# Altium PCB Phaser.PcbDoc (part 4 of 16)
Units mm, origin at the board's own origin, x right, y up, seen from the top; angles counter-clockwise.
Board outline 161.99 x 100 mm, 6 copper layers (TopLayer, MidLayer1, MidLayer2, SignalLayer1, Internal Plane 1, BottomLayer), stack 1.528 mm thick; 1017 components, 665 nets, 3453 pads, 2223 vias.
Unrouted connection lines stored in the file: 1.
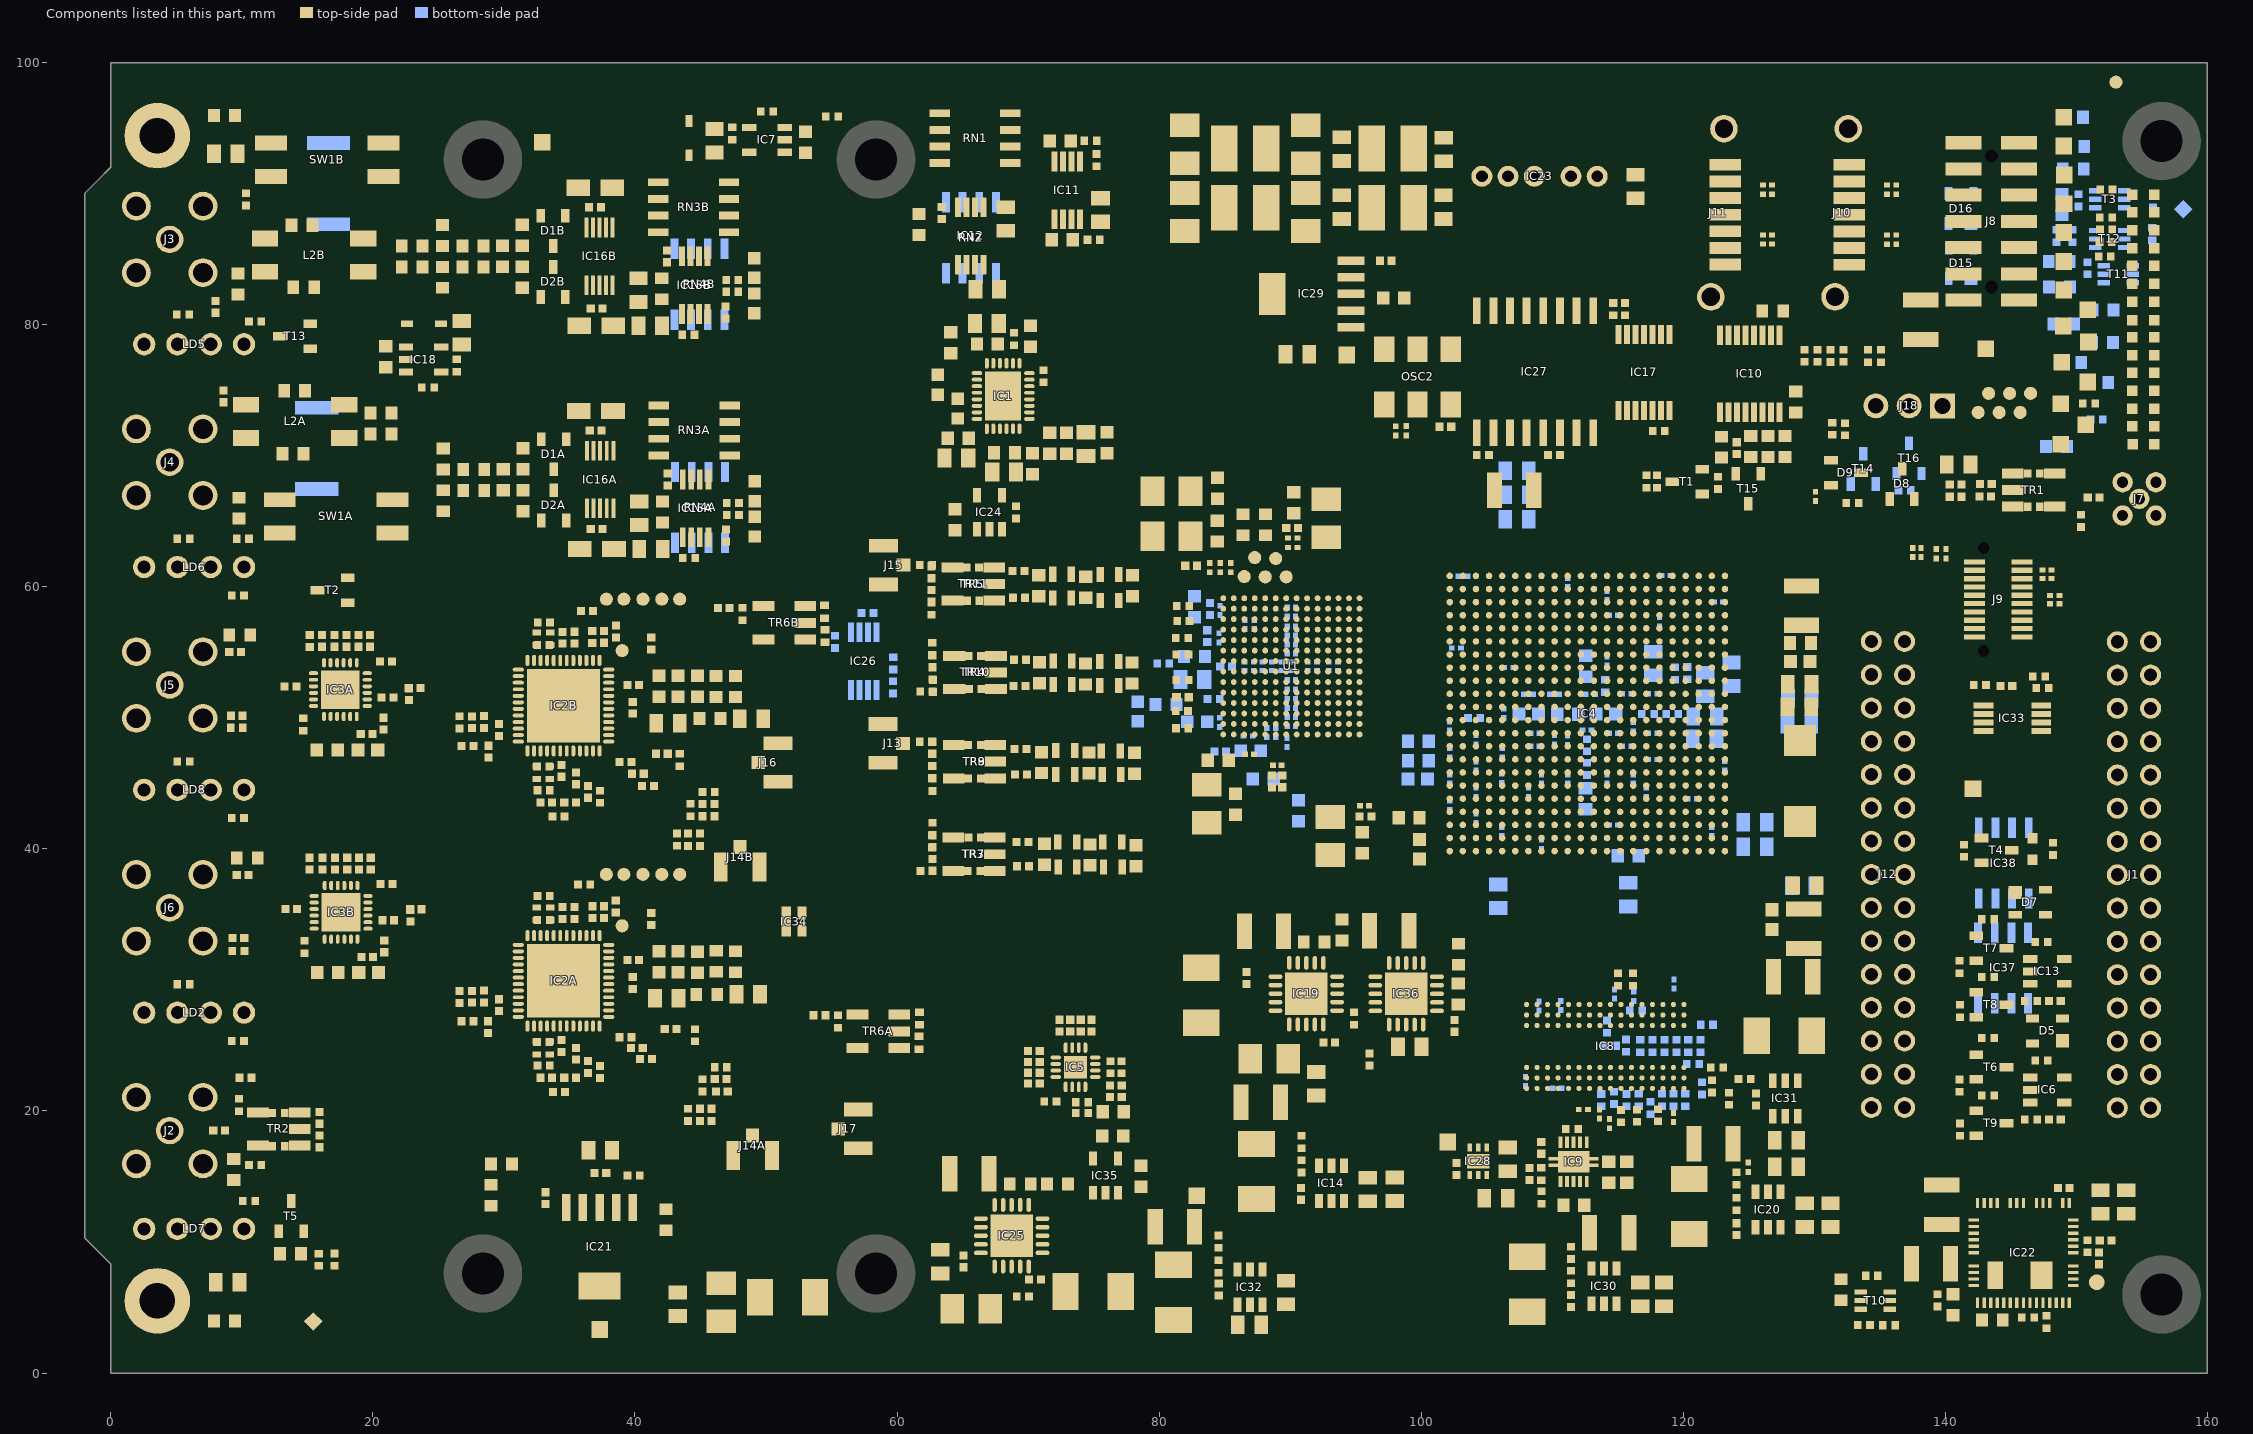
[diagram p7: the components of this part, seen from the top]

## Part data (continued)
C146 C224A C224B C226A C226B C227A C227B: library part CC0603_1NF_50V_1%_NP0, "Non-polarised capacitor", Case=0603, Manufacturer=GENERIC, Manufacturer1 ComponentHeight=0.9mm, Manufacturer1 Example=AVX, Manufacturer1 Part Number=06035A102FAT2A, Tolerance=±1%, Voltage=50V, Author="CERN DEM JLC", Component Type=Standard, CreateDate=15.06.2017, HelpURL=\\cern.ch\dfs\Applications\Altium\Datasheets\CC0603_C0G_AVX.pdf, LatestRevisionDate=15.06.2017, Manufacturer Part Number=CC0603_1NF_50V_1%_NP0, Mounted=Yes, Part Description="SMD Multilayer Chip Ceramic Capacitor", Part Number=CC0603_1NF_50V_1%_NP0, Pin Count=2, Sense=No, SMD=Yes, Socket=No, Status=None, TC=C0G/NP0
C156 C180 C184 C251 C255 C301 C305 C319 C350 C352 C364 C365: library part CTE3528-21_22UF_10V_10%_LESR0700, "Polarised capacitor", Case=B, Manufacturer=GENERIC, Manufacturer1 ComponentHeight=2.1mm, Manufacturer1 Example=AVX, Manufacturer1 Part Number=TPSB226K010R0700, Tolerance=±10%, Voltage=10V, Author="CERN DEM JLC", Component Type=Standard, CreateDate=05.05.2008, HelpURL=\\cern.ch\dfs\Applications\Altium\Datasheets\CTE-LESR_AVX_TPS.pdf, LatestRevisionDate=20.01.2009, Manufacturer Part Number=CTE3528-21_22UF_10V_10%_LESR0700, Mounted=Yes, Part Description="Low ESR 0R7 Solid Tantalum Chip Capacitor", Part Number=CTE3528-21_22UF_10V_10%_LESR0700, Pin Count=2, Sense=No, SMD=Yes, Socket=No, Status=Preferred
C161 C267 C369A C369B C370A C370B C371A C371B C372A C372B C373A C373B C374A C374B C375A C375B C376A C376B C377A C377B: library part CC0402_10NF_25V_10%_X7R, "Non-polarised capacitor", Case=0402, Manufacturer=GENERIC, Manufacturer1 ComponentHeight=0.55mm, Manufacturer1 Example=TDK, Manufacturer1 Part Number=C1005X7R1E103KT, Tolerance=±10%, Voltage=25V, Author="CERN DEM JLC", Component Type=Standard, CreateDate=25.10.2012, HelpURL=\\cern.ch\dfs\Applications\Altium\Datasheets\CC0402_X7R_TDK_C.pdf, LatestRevisionDate=25.10.2012, Manufacturer Part Number=CC0402_10NF_25V_10%_X7R, Mounted=Yes, Part Description="SMD Multilayer Chip Ceramic Capacitor", Part Number=CC0402_10NF_25V_10%_X7R, Pin Count=2, Sense=No, SMD=Yes, Socket=No, Status=Preferred, TC=X7R
C211: library part CC0603_1NF_100V_10%_X7R, "Non-polarised capacitor", Case=0603, Manufacturer=GENERIC, Manufacturer1 ComponentHeight=0.87mm, Manufacturer1 Example=KEMET, Manufacturer1 Part Number=C0603C102K1RACTU, Tolerance=±10%, Voltage=100V, Author="CERN DEM JLC", Component Type=Standard, CreateDate=12.12.2013, HelpURL=\\cern.ch\dfs\Applications\Altium\Datasheets\CC0603_X7R_KEMET.pdf, LatestRevisionDate=12.12.2013, Manufacturer Part Number=CC0603_1NF_100V_10%_X7R, Mounted=Yes, Part Description="SMD Multilayer Chip Ceramic Capacitor", Part Number=CC0603_1NF_100V_10%_X7R, Pin Count=2, Sense=No, SMD=Yes, Socket=No, Status=Preferred, TC=X7R
C218 C235: library part CC1210_47UF_10V_10%_X7R, "Non-polarised capacitor", Case=1210, Manufacturer=GENERIC, Manufacturer1 ComponentHeight=2.7mm, Manufacturer1 Example=MURATA, Manufacturer1 Part Number=GRM32ER71A476KE15, Tolerance=±10%, Voltage=10V, Author="CERN DEM BC", Component Type=Standard, CreateDate=18.11.2015, HelpURL=\\cern.ch\dfs\Applications\Altium\Datasheets\CC1210_X7R_MURATA.pdf, LatestRevisionDate=18.11.2015, Manufacturer Part Number=CC1210_47UF_10V_10%_X7R, Mounted=Yes, Part Description="SMD Multilayer Chip Ceramic Capacitor", Part Number=CC1210_47UF_10V_10%_X7R, Pin Count=2, Sense=No, SMD=Yes, Socket=No, Status=None, TC=X7R
C221A C221B C225A C225B: library part CC0603_8.2PF_50V_0.5PF_NP0, "Non-polarised capacitor", Case=0603, Manufacturer=GENERIC, Manufacturer1 ComponentHeight=0.87mm, Manufacturer1 Example=PHYCOMP, Manufacturer1 Part Number=223886715828, Tolerance=±0.5pF, Voltage=50V, Author="CERN DEM JLC", Component Type=Standard, CreateDate=03.12.2007, HelpURL=\\cern.ch\dfs\Applications\Altium\Datasheets\CC0603_NP0_PHYCOMP.pdf, LatestRevisionDate=03.12.2007, Manufacturer Part Number=CC0603_8.2PF_50V_0.5PF_NP0, Mounted=Yes, Part Description="SMD Multilayer Chip Ceramic Capacitor", Part Number=CC0603_8.2PF_50V_0.5PF_NP0, Pin Count=2, Sense=No, SMD=Yes, Socket=No, Status=Preferred, TC=C0G/NP0
C222A C222B: library part CC0603_39PF_50V_5%_NP0, "Non-polarised capacitor", Case=0603, Manufacturer=GENERIC, Manufacturer1 ComponentHeight=0.87mm, Manufacturer1 Example=PHYCOMP, Manufacturer1 Part Number=223886715399, Tolerance=±5%, Voltage=50V, Author="CERN DEM JLC", Component Type=Standard, CreateDate=03.12.2007, HelpURL=\\cern.ch\dfs\Applications\Altium\Datasheets\CC0603_NP0_PHYCOMP.pdf, LatestRevisionDate=03.12.2007, Manufacturer Part Number=CC0603_39PF_50V_5%_NP0, Mounted=Yes, Part Description="SMD Multilayer Chip Ceramic Capacitor", Part Number=CC0603_39PF_50V_5%_NP0, Pin Count=2, Sense=No, SMD=Yes, Socket=No, Status=Preferred, TC=C0G/NP0
C228A C228B C231A C231B: library part CTE3216-18_10UF_16V_20%_AVX_TCJ, "Polarised capacitor", Case=A, Manufacturer=AVX, Manufacturer Part Number=TCJA106M016R0200, Tolerance=±20%, Voltage=16V, Author="CERN DEM JLC", Component Type=Standard, ComponentHeight=1.8mm, CreateDate=29.03.2012, HelpURL=\\cern.ch\dfs\Applications\Altium\Datasheets\CTE_AVX_TCJ.pdf, LatestRevisionDate=29.03.2012, Mounted=Yes, Part Description="ESR 0R200 Tantalum Solid Electrolytic Chip Capacitor with Conductive Polymer Electrode", Part Number=CTE3216-18_10UF_16V_20%_AVX_TCJ, Pin Count=2, Sense=No, SMD=Yes, Socket=No, Status=Preferred
C243 C244: library part CC0805_NO-VALUE, "Non-polarised capacitor", Case=0805, Manufacturer1 ComponentHeight=1.35mm, Author="CERN DEM JLC", Component Type=Standard, CreateDate=10.12.2008, HelpURL=Undefined, LatestRevisionDate=11.09.2013, Manufacturer=Undefined, Manufacturer Part Number=CC0805_NO-VALUE, Mounted=No, Part Description="Reserved Footprint For 0805(2012) Chip Ceramic Capacitor", Part Number=CC0805_NO-VALUE, Pin Count=2, Sense=No, SMD=Yes, Socket=No, Status=None
C246A C246B C283A C283B: library part CC0603_1.5NF_50V_5%_NP0, "Non-polarised capacitor", Case=0603, Manufacturer=GENERIC, Manufacturer1 ComponentHeight=0.9mm, Manufacturer1 Example=MURATA, Manufacturer1 Part Number=GRM1885C1H152JA01D, Tolerance=±5%, Voltage=50V, Author="CERN DEM JLC", Component Type=Standard, CreateDate=08.02.2011, HelpURL=\\cern.ch\dfs\Applications\Altium\Datasheets\CC0603_NP0_MURATA.pdf, LatestRevisionDate=08.02.2011, Manufacturer Part Number=CC0603_1.5NF_50V_5%_NP0, Mounted=Yes, Part Description="SMD Multilayer Chip Ceramic Capacitor", Part Number=CC0603_1.5NF_50V_5%_NP0, Pin Count=2, Sense=No, SMD=Yes, Socket=No, Status=None, TC=C0G/NP0
C277A C277B: library part CC0603_10UF_16V_20%_X5R, "Non-polarised capacitor", Case=0603, Manufacturer=GENERIC, Manufacturer1 ComponentHeight=0.8mm, Manufacturer1 Example=MURATA, Manufacturer1 Part Number=GRM188R61C106MA73D, Tolerance=±20%, Voltage=16V, Author="CERN DEM MR", Component Type=Standard, CreateDate=2016-03-02, HelpURL=\\cern.ch\dfs\Applications\Altium\Datasheets\CC0603_X5R_MURATA_GRM.pdf, LatestRevisionDate=2016-03-02, Manufacturer Part Number=CC0603_10UF_16V_20%_X5R, Mounted=Yes, Part Description="SMD Multilayer Chip Ceramic Capacitor", Part Number=CC0603_10UF_16V_20%_X5R, Pin Count=2, Sense=No, SMD=Yes, Socket=No, Status=None, TC=X5R
C280A C280B C281A C281B: library part CC0402_0.5PF_25V_0.05PF_AVX_04023J0R5ABSTR, "Non-polarised capacitor", Case=0402, Manufacturer=AVX, Manufacturer Part Number=04023J0R5ABSTR, Tolerance=±0.05pF, Voltage=25V, Author="CERN DEM JLC", Component Type=Standard, ComponentHeight=0.5mm, CreateDate=2017-02-22, HelpURL=\\cern.ch\dfs\Applications\Altium\Datasheets\CC0402_AVX_ACCU-P.pdf, LatestRevisionDate=2017-02-22, Mounted=Yes, Part Description="Thin-Film Chip Capacitors for RF Signal and Power Applications, Accu-P Series", Part Number=CC0402_0.5PF_25V_0.05PF_AVX_04023J0R5ABSTR, Pin Count=2, Sense=No, SMD=Yes, Socket=No, Status=None
C282A C282B: library part CC0603_120PF_50V_5%_NP0, "Non-polarised capacitor", Case=0603, Manufacturer=GENERIC, Manufacturer1 ComponentHeight=0.87mm, Manufacturer1 Example=PHYCOMP, Manufacturer1 Part Number=223886715121, Tolerance=±5%, Voltage=50V, Author="CERN DEM JLC", Component Type=Standard, CreateDate=03.12.2007, HelpURL=\\cern.ch\dfs\Applications\Altium\Datasheets\CC0603_NP0_PHYCOMP.pdf, LatestRevisionDate=03.12.2007, Manufacturer Part Number=CC0603_120PF_50V_5%_NP0, Mounted=Yes, Part Description="SMD Multilayer Chip Ceramic Capacitor", Part Number=CC0603_120PF_50V_5%_NP0, Pin Count=2, Sense=No, SMD=Yes, Socket=No, Status=Preferred, TC=C0G/NP0
C284A C284B C285A C285B: library part CC0805_33pF_50V_5%_NP0, "Non-polarised capacitor", Case=0805, Manufacturer=GENERIC, Manufacturer1 ComponentHeight=1.35mm, Manufacturer1 Example=PHYCOMP, Manufacturer1 Part Number=223886115339, Manufacturer Part Number=CC0805_33PF_50V_5%_NP0, Tolerance=±5%, Voltage=50V, Author="CERN DEM JLC", Component Type=Standard, CreateDate=03.12.2007, HelpURL=\\cern.ch\dfs\Applications\Altium\Datasheets\CC0805_NP0_PHYCOMP.pdf, LatestRevisionDate=03.12.2007, Mounted=Yes, Part Description="SMD Multilayer Chip Ceramic Capacitor", Part Number=CC0805_33PF_50V_5%_NP0, Pin Count=2, Sense=No, SMD=Yes, Socket=No, Status=Preferred, TC=C0G/NP0
C322 C1009: library part CC0402_2.2UF_6.3V_10%_X5R, "Non-polarised capacitor", Case=0402, Manufacturer=GENERIC, Manufacturer1 ComponentHeight=0.55mm, Manufacturer1 Example=TDK, Manufacturer1 Part Number=C1005X5R0J225K050BC, Tolerance=±10%, Voltage=6.3V, Author="CERN DEM JMW", Component Type=Standard, CreateDate=22.09.2015, HelpURL=\\cern.ch\dfs\Applications\Altium\Datasheets\CC0402_X5R_TDK_C.pdf, LatestRevisionDate=22.09.2015, Manufacturer Part Number=CC0402_2.2UF_6.3V_10%_X5R, Mounted=Yes, Part Description="SMD Multilayer Chip Ceramic Capacitor", Part Number=CC0402_2.2UF_6.3V_10%_X5R, Pin Count=2, Sense=No, SMD=Yes, Socket=No, Status=Preferred, TC=X5R
C331: library part CC0402_15PF_50V_5%_C0G, "Non-polarised capacitor", Case=0402, Manufacturer=GENERIC, Manufacturer1 ComponentHeight=0.55mm, Manufacturer1 Example=KEMET, Manufacturer1 Part Number=C0402C150J5GACTU, Tolerance=±5%, Voltage=50V, Author="CERN DEM JLC", Component Type=Standard, CreateDate=03.12.2007, HelpURL="\\cern.ch\dfs\Applications\Altium\Datasheets\CC0805_C0G_KEMET_(Commercial Grade).pdf", LatestRevisionDate=22.04.2015, Manufacturer Part Number=CC0402_15PF_50V_5%_C0G, Mounted=Yes, Part Description="SMD Multilayer Chip Ceramic Capacitor", Part Number=CC0402_15PF_50V_5%_C0G, Pin Count=2, Sense=No, SMD=Yes, Socket=No, Status=Preferred, TC=C0G/NP0
D1A D1B D2A D2B D8 D9: "Serial Diode", Case=SOT23-3, Manufacturer="NXP SEMICONDUCTORS", Power=250mW, Voltage=75V, Author="CERN DEM JMW", Bonding=No, Component Type=Standard, ComponentHeight=1.1mm, CreateDate=2008-11-21, Device=BAV199, HelpURL=\\cern.ch\dfs\Applications\Altium\Datasheets\BAV199.pdf, LatestRevisionDate=2008-11-21, Manufacturer Part Number=BAV199, Mounted=Yes, PackageDescription="SOT23 3-Leads, Pitch 0.95mm - Body 1.4x3mm, IPC Medium Density", Part Description="Low-Leakage Double Diode", Part Number=BAV199, Pin Count=3, PressFit=No, Sense=No, SMD=Yes, Socket=No
D3 D6: "Schottky Diode", Case=SOD323, Manufacturer="NXP SEMICONDUCTORS", Power=200mA, Voltage=30V, Author="CERN DEM JLC", Bonding=No, Component Type=Standard, ComponentHeight=1.1mm, CreateDate=2012-12-06, Device=1PS76SB10, HelpURL=\\cern.ch\dfs\Applications\Altium\Datasheets\1PS76SB10.pdf, LatestRevisionDate=2012-12-06, Manufacturer Part Number=1PS76SB10, Mounted=Yes, PackageDescription="Small Outline Diode Flat Lead (SOD-323), 1.70mm W X 1.25mm L X 1.10mm H body,  IPC Medium Density", Part Description="Schottky Barrier Single Diode", Part Number=1PS76SB10, Pin Count=2, PressFit=No, Sense=No, SMD=Yes, Socket=No
D5 D7 D15 D16: "Ultra Low Capacitance Double Rail-to-Rail ESD Protection Diode", Case=SOT143B, Manufacturer="NXP SEMICONDUCTORS", Voltage=5.5V, Author="CERN DEM JLC", Bonding=No, Component Type=Standard, ComponentHeight=1.1mm, CreateDate=22.03.2011, Device=PRTR5V0U2X, HelpURL=\\cern.ch\dfs\Applications\Altium\Datasheets\PRTR5V0U2X.pdf, LatestRevisionDate=22.03.2011, Manufacturer Part Number=PRTR5V0U2X, Mounted=Yes, PackageDescription="SOT143B, SOT, 1.90mm Pitch; 4 Pin, 1.30mm W X 2.90mm L X 1.10mm H body, IPC Medium Density", Part Description="Ultra Low Capacitance (1pF) Double Rail-to-Rail ESD Protection Diode (8kV)", Part Number=PRTR5V0U2X, Pin Count=4, PressFit=No, Sense=No, SMD=Yes, Socket=No
FTG1: library part FIDUCIAL_TARGET_C100-200, "Fiducial Target", Author="CERN DEM JLC", Component Type="Standard (No BOM)", ComponentHeight=0mm, CreateDate=09.02.2010, Family=Fiducial, HelpURL=Undefined, LatestRevisionDate=04.04.2012, Mounted=No, PackageDescription="Round Fiducial Target, Top Layer, 1.0mm, Top Solder 2.0mm, Keepout =2.0mm", Part Description="Round Fiducial Target, Top Layer, 1.0mm, Top Solder 2.0mm, Keepout =2.0mm", Part Number=FIDUCIAL_TARGET_C100-200, Pin Count=1, Sense=No, SMD=Yes, Socket=No, Status=None
FTG2 FTG3 FTG4: library part FIDUCIAL_TARGET_S100-200, "Fiducial Target", Author="CERN DEM JLC", Component Type="Standard (No BOM)", ComponentHeight=0mm, CreateDate=09.02.2010, Family=Fiducial, HelpURL=Undefined, LatestRevisionDate=04.04.2012, Mounted=No, PackageDescription="Square Fiducial Target, Top Layer, 1.0mm, Top Solder 2.0mm, Keepout =2.0mm", Part Description="Square Fiducial Target, Top Layer, 1.0mm, Top Solder 2.0mm, Keepout =2.0mm", Part Number=FIDUCIAL_TARGET_S100-200, Pin Count=1, Sense=No, SMD=Yes, Socket=No, Status=None
HS1: "Heat Sink Without Pad", Manufacturer="Radian Thermal Products, Inc.", Manufacturer Part Number=FI23+BU+T725, ComponentHeight="16 mm", HelpURL=https://www.radianheatsinks.com/product/fi23/, Part Description="23 x 23 x 16 mm, clip on heatsink with fan for IC design BGA and others"
HS2: library part HEAT_SINK_BGA_12x12x18, "Rth: 27.5K/W - L 12mm x W 12mm x H 18mm Black Anodized Heatsinks for BGA", Manufacturer=CUI, Manufacturer Part Number=HSB03-121218, Author=GK, Component Type=Standard, ComponentHeight=10mm, CreateDate=28.05.2015, HelpURL="\\cern.ch\dfs\Applications\Altium\Datasheets\HSINK_FISCHER_ICK SMD A 13 SA.pdf", LatestRevisionDate=28.05.2015, Mounted=Yes, PackageDescription="Rth: 24K/W - L 12mm x W 12mm x H 18mm Black Anodized Heatsinks for BGA", Part Description="Rth: 27.5K/W - L 12mm x W 12mm x H 18mm Black Anodized Heatsinks for BGA", Part Number=HSB03-121218, Pin Count=0, PressFit=No, Sense=No, SMD=No, Socket=No, Status=None
HS3A HS3B: library part HEAT_SINK_IC_7x7x15, "Alphacool GPU RAM Aluminium Heatsinks 7x7mm - black", Manufacturer=Alphacool, Manufacturer Part Number=17156, Part Number=4250197171564, Author=GK, Component Type=Standard, ComponentHeight=18, CreateDate=28.05.2015, HelpURL="\\cern.ch\dfs\Applications\Altium\Datasheets\HSINK_FISCHER_ICK SMD A 13 SA.pdf", LatestRevisionDate=28.05.2015, Mounted=Yes, PackageDescription="Alphacool GPU RAM Aluminium Heatsinks 7x7mm - black", Part Description="Alphacool GPU RAM Aluminium Heatsinks 7x7mm", Pin Count=0, PressFit=No, Sense=No, SMD=No, Socket=No, Status=None
IC1: "Dual, 16-Bit, 5Msps Differential Input ADC with Wide Input Common Mode Range", Case=QFN28, Manufacturer="ANALOG DEVICES", Author="CERN DEM JMW", Bonding=No, Component Type=Standard, ComponentHeight=0.8mm, CreateDate=2019-11-29, Device=LTC2323CUFD-16#PBF, HelpURL=\\cern.ch\dfs\Applications\Altium\Datasheets\LTC2323CUFD-16#PBF.pdf, LatestRevisionDate=2019-11-29, Manufacturer Part Number=LTC2323CUFD-16#PBF, Mounted=Yes, PackageDescription="QFN, 0.50mm Pitch, Rectangular, 6 pin X 8 pin, 4mm X 5mm X 0.80mm H Body  (w/thermal tab 2.75 X 3.75mm), IPC Medium Density", Part Description="Dual, 16-Bit, 5Msps Differential Input ADC with Wide Input Common Mode Range", Part Number=LTC2323CUFD-16#PBF, Pin Count=29, PressFit=No, Sense=No, SMD=Yes, Socket=No
IC2A IC2B: "Integrated IQ Modulator PLL/VCO", Case=QFN48, Manufacturer="TEXAS INSTRUMENTS", Author="CERN DEM JMW", Bonding=No, Component Type=Standard, ComponentHeight=1mm, CreateDate=2019-11-29, Device=TRF372017IRGZ, HelpURL=\\cern.ch\dfs\Applications\Altium\Datasheets\TRF372017IRGZ.pdf, LatestRevisionDate=2019-11-29, Manufacturer Part Number=TRF372017IRGZ, Mounted=Yes, PackageDescription="QFN, 0.50mm Pitch, Square; 48 Pin, 7.00mm L X 7.00mm W X 1.00mm H body (W/Thermal Tab 5.6mm X 5.6mm), IPC Medium Density", Part Description="Integrated IQ Modulator PLL/VCO", Part Number=TRF372017IRGZ, Pin Count=49, PressFit=No, Sense=No, SMD=Yes, Socket=No
IC3A IC3B: "0.5dB LSB GaAs MMIC 6-bit Digital Serial Control Attenuator, DC - 4GHz", Case=QFN24, Manufacturer="HITTITE MICROWAVE CORP", Author="CERN DEM JMW", Bonding=No, Component Type=Standard, ComponentHeight=1mm, CreateDate=2016-08-17, Device=HMC542BLP4E, HelpURL=\\cern.ch\dfs\Applications\Altium\Datasheets\HMC542BLP4E.pdf, LatestRevisionDate=2016-08-17, Manufacturer Part Number=HMC542BLP4E, Mounted=Yes, PackageDescription="QFN, 0.50mm Pitch, Square; 24 Pin, 4.00mm L X 4.00mm W X 1.00mm H Body (w/thermal Tab 2.95 X 2.95mm), IPC Medium Density", Part Description="0.5dB LSB GaAs MMIC 6-bit Digital Serial Control Attenuator, DC to 4GHz", Part Number=HMC542BLP4E, Pin Count=25, PressFit=No, Sense=No, SMD=Yes, Socket=No
IC4: library part CMP-0364-00028-3, "Artix-7 FPGA, 285 User I/Os, 4 GTP, 484-Ball BGA, Speed Grade 3, Extended Grade, Pb-Free", Generic Part Number=XC7A100T, Manufacturer=Xilinx, Block RAM Blocks (18Kb)=270, Block RAM Blocks (36Kb)=135, Block RAM Blocks (Max Kb)=4860, CLBs (Max Distributed RAM Kb)=1188, CLBs (Slices)=15850, Clock Mgmt Tiles (CMTs)=6, Code_JEDEC=MS-034-AAJ-1, ComponentLink1Description=Datasheet, ComponentLink1URL=http://www.xilinx.com/support/documentation/data_sheets/ds180_7Series_Overview.pdf, ComponentLink2Description="Package Specification", ComponentLink2URL=http://www.xilinx.com/support/documentation/user_guides/ug475_7Series_Pkg_Pinout.pdf, ComponentLink3Description="DC and Switching Characteristics", ComponentLink3URL=http://www.xilinx.com/support/documentation/data_sheets/ds181_Artix_7_Data_Sheet.pdf, ComponentLink4Description="Package File", ComponentLink4URL=http://www.xilinx.com/support/packagefiles/a7packages/xc7a100tfgg484pkg.txt, ComponentLink5Description="Packaging and Pinout", ComponentLink5URL=http://www.xilinx.com/support/documentation/user_guides/ug475_7Series_Pkg_Pinout.pdf, DatasheetVersion=v1.12, DSP48E1 Slices=240, Logic Cells=101440, Max User I/O=300, Mounting Technology="Surface Mount", NexusDeviceID=XC7A100T-3FGG484E, PackageDescription="Wire-Bond Fine-Pitch BGA, Body 23 x 23 mm, 1.0 mm Pitch", PackageReference=FGG484, PackageVersion="Rev 1.8", PartNumber=XC7A100T-3FGG484E, RoHS=Pb-Free, Speed Grade=-3
IC5: "Low-Jitter LVDS Fanout Clock Buffers, 10-Output,  Any-Input, Any-Frequency up to 1250MHz", Case=QFN16, Manufacturer="SILICON LABS", Author="CERN DEM MR", Bonding=No, Component Type=Standard, ComponentHeight=0.9mm, CreateDate=04.09.2017, Device=Si53340-B-GM, HelpURL=\\cern.ch\dfs\Applications\Altium\Datasheets\Si53340-B-GM.pdf, LatestRevisionDate=04.09.2017, Manufacturer Part Number=Si53340-B-GM, Mounted=Yes, PackageDescription="QFN, 0.50mm Pitch, Square; 16 Pin, 3.00mm L X 3.00mm W X 0.90mm H Body (w/thermal tab 1.75mm x 1.75mm), IPC Medium Density", Part Description="Low-Jitter LVDS Fanout Clock Buffers, 10-Output,  Any-Input, Any-Frequency up to 1250MHz", Part Number=Si53340-B-GM, Pin Count=17, PressFit=No, Sense=No, SMD=Yes, Socket=No
IC6 IC13: "1.7V-5.5V, 2K I2C Serial EEPROM With EUI-48 Node Identity", Case=SOT23-5, Manufacturer="MICROCHIP TECHNOLOGY", Author="CERN DEM MR", Bonding=No, Component Type=Standard, ComponentHeight=1.45mm, CreateDate=31.03.2016, Device=24AA02E48T-I/OT, HelpURL=\\cern.ch\dfs\Applications\Altium\Datasheets\24AA02E48T-I-OT.pdf, LatestRevisionDate=31.03.2016, Manufacturer Part Number=24AA02E48T-I/OT, Mounted=Yes, PackageDescription="SOT, 0.95mm pitch; 5 pin, 1.60mm W X 2.90mm L X 1.45mm H body, IPC Medium Density", Part Description="1.7V-5.5V, 2K I2C Serial EEPROM With EUI-48 Node Identity", Part Number=24AA02E48T-I/OT, Pin Count=5, PressFit=No, Sense=No, SMD=Yes, Socket=No
IC7: "100mA, Low Noise, LDO Micropower Adjustable Regulator in SOT-23", Case=SOT23, Manufacturer="LINEAR TECHNOLOGY", Author="CERN DEM JLC", Bonding=No, Component Type=Standard, ComponentHeight=1mm, CreateDate=26.08.2013, Device=LT1761ES5-SD#TRMPBF, HelpURL=\\cern.ch\dfs\Applications\Altium\Datasheets\LT1761ES5-SD#TRMPBF.pdf, LatestRevisionDate=26.08.2013, Manufacturer Part Number=LT1761ES5-SD#TRMPBF, Mounted=Yes, PackageDescription="SOT23, 0.95mm pitch; 5 pin, 1.6mm W X 2.9mm L, IPC Medium Density", Part Description="1.22V to 20V, 100mA, Low Noise, LDO Adjustable Micropower Regulator", Part Number=LT1761ES5-SD#TRMPBF, Pin Count=5, PressFit=No, Sense=No, SMD=Yes, Socket=No
IC8: "32 Meg x 16 x 8 Banks DDR3L SDRAM", Case=BGA96, Manufacturer="MICRON TECHNOLOGY", Author="CERN DEM MR", Bonding=No, Component Type=Standard, ComponentHeight=1.2mm, CreateDate=2015-12-14, Device=MT41K256M16TW-107:P, HelpURL=\\cern.ch\dfs\Applications\Altium\Datasheets\MT41K256M16TW-107-P.pdf, LatestRevisionDate=2015-12-14, Manufacturer Part Number=MT41K256M16TW-107:P, Mounted=Yes, PackageDescription="BGA 0.8mm, Pitch, Square 96 Pin, 9 Columns x 16 Rows, Body 14mm X 8mm X 1.2mm H", Part Description="+1.5V, 4Gb (32Meg x 16 x 8 banks) DDR3L SDRAM", Part Number=MT41K256M16TW-107:P, Pin Count=96, PressFit=No, Sense=No, SMD=Yes, Socket=No
IC9: "Sink/Source DDR Termination Regulator", Case=SON10, Manufacturer="TEXAS INSTRUMENTS", Author="CERN DEM JLC", Bonding=No, Component Type=Standard, ComponentHeight=1mm, CreateDate=03.02.2010, Device=TPS51200DRCT, HelpURL=\\cern.ch\dfs\Applications\Altium\Datasheets\TPS51200DRCT.pdf, LatestRevisionDate=06.11.2013, Manufacturer Part Number=TPS51200DRCT, Mounted=Yes, PackageDescription="SON, 0.50mm Pitch, 10-pin, 3.00mm W  X 3.00mm L X 1.00mm Height, (w/thermal tab 1.75 X 2.50 mm)", Part Description="3.3V Sink/Source DDR Termination Regulator", Part Number=TPS51200DRCT, Pin Count=11, PressFit=No, Sense=No, SMD=Yes, Socket=No
IC10: "I2C-bus to SPI bridge", Case=TSSOP16, Manufacturer="NXP SEMICONDUCTORS", Author="CERN DEM MR", Bonding=No, Component Type=Standard, ComponentHeight=1.1mm, CreateDate=14/12/2015, Device=SC18IS602B, HelpURL=\\cern.ch\dfs\Applications\Altium\Datasheets\SC18IS602B.pdf, LatestRevisionDate=14/12/2015, Manufacturer Part Number=SC18IS602B, Mounted=Yes, PackageDescription="SOP, 0.65mm pitch; 16 pin, 4.40mm W X 5.00mm L X 1.10mm H body IPC Medium Density", Part Description="I2C-Bus to SPI Bridge", Part Number=SC18IS602B, Pin Count=16, PressFit=No, Sense=No, SMD=Yes, Socket=No
IC11: "0.25ppm Noise, Low Drift Precision Buffered Voltage Reference", Case=SSOP8, Manufacturer="LINEAR TECHNOLOGY", Author=GK, Bonding=No, Component Type=Standard, ComponentHeight=1.1mm, CreateDate=07.06.2012, Device=LTC6655BHMS8-4.096#PBF, HelpURL=\\cern.ch\dfs\Applications\Altium\Datasheets\LTC6655BHMS8-5#PBF.pdf, LatestRevisionDate=07.06.2012, Manufacturer Part Number=LTC6655BHMS8-4.096#PBF, Mounted=Yes, PackageDescription="SOP, 8-Leads, Body 3.1x3.1mm (max), Pitch 0.65mm, IPC Medium Density", Part Description="4.096V, 0.25ppm Noise, Low Drift Precision Buffered Voltage Reference", Part Number=LTC6655BHMS8-4.096#PBF, Pin Count=8, PressFit=No, Sense=No, SMD=Yes, Socket=No
IC12 IC15A IC15B: "36-V, Precision, Rail-to-Rail Input Output, Low Offset Voltage Op Amp 8-VSSOP", Case=MSOP8, Manufacturer="TEXAS INSTRUMENTS", Author=GK, Bonding=No, Component Type=Standard, ComponentHeight=1.1mm, CreateDate=20.04.2017, Device=OPA2197IDGKR, HelpURL=\\cern.ch\dfs\Applications\Altium\Datasheets\OPA2140AIDGK.pdf, LatestRevisionDate=20.04.2017, Manufacturer Part Number=OPA2197IDGKR, Mounted=Yes, PackageDescription="SOP, 0.65mm pitch; 8 pin, 3.00mm W X 3.00mm L X 1.10mm H body, IPC Medium Density", Part Description="High-Precision, Low-Noise, Rail-to-Rail Output,10-MHz Op Amp", Part Number=OPA2197IDGKR, Pin Count=8, PressFit=No, Sense=No, SMD=Yes, Socket=No
IC14 IC20 IC30 IC31 IC32: "4.5V to 17V Input, 3A Synchronous Step-Down Voltage Regulator", Case=SOT23-6, Manufacturer="TEXAS INSTRUMENTS", Author="CERN DEM MR", Bonding=No, Component Type=Standard, ComponentHeight=1.1mm, CreateDate=23.08.2018, Device=TPS563201DDC, HelpURL=\\cern.ch\dfs\Applications\Altium\Datasheets\TPS563201DDC.pdf, LatestRevisionDate=23.08.2018, Manufacturer Part Number=TPS563201DDC, Mounted=Yes, PackageDescription="SOT, 0.95mm Pitch; 6 Pin, 1.60mm W X 2.90mm L X 1.10mm H Body, IPC Medium Density", Part Description="4.5V to 17V Input, 3A Synchronous Step-Down Voltage Regulator", Part Number=TPS563201DDC, Pin Count=6, PressFit=No, Sense=No, SMD=Yes, Socket=No
IC16A IC16B: "10MHz, 20V/us, G= 1, 10, 100, 1000 iCMOS Programmable Gain Instrumentation Amplifier", Case=MSOP10, Manufacturer="ANALOG DEVICES", Author="CERN DEM JLC", Bonding=No, Component Type=Standard, ComponentHeight=1.1mm, CreateDate=2013-10-02, Device=AD8253ARMZ, HelpURL=\\cern.ch\dfs\Applications\Altium\Datasheets\AD8253ARMZ.pdf, LatestRevisionDate=2013-10-02, Manufacturer Part Number=AD8253ARMZ, Mounted=Yes, PackageDescription="MSOP, 10-Leads, Body 3.1x3.1mm (max), Pitch 0.50mm, IPC Medium Density", Part Description="10MHz, 20V/us, G= 1, 10, 100, 1000 iCMOS Programmable Gain Instrumentation Amplifier", Part Number=AD8253ARMZ, Pin Count=8, PressFit=No, Sense=No, SMD=Yes, Socket=No
IC17: Case=TSSOP14, Manufacturer="NXP SEMICONDUCTORS", Author="CERN DEM JLC", Bonding=No, Component Type=Standard, ComponentHeight=1.1mm, CreateDate=2014-11-19, Device=74HC4066PW, HelpURL=\\cern.ch\dfs\Applications\Altium\Datasheets\74HC4066PW.pdf, LatestRevisionDate=2014-11-19, Manufacturer Part Number=74HC4066PW, Mounted=Yes, PackageDescription="SOP, 14-Leads, Body 4.4x5mm (max), Pitch 0.65mm, IPC Medium Density", Part Description="Quad Single-Pole Single-Throw Analog Switch", Part Number=74HC4066PW, Pin Count=14, PressFit=No, SMD=Yes, Socket=No, Table="Standard Logic"
IC18: "200mA, Low Noise, Low Dropout Negative Micropower Regulator", Case=SOT23-5, Manufacturer="LINEAR TECHNOLOGY", Author="CERN DEM JLC", Bonding=No, Component Type=Standard, ComponentHeight=1mm, CreateDate=05.05.2009, Device=LT1964ES5-SD#TRMPBF, HelpURL=\\cern.ch\dfs\Applications\Altium\Datasheets\LT1964ES5-SD#TRMPBF.pdf, LatestRevisionDate=05.05.2009, Manufacturer Part Number=LT1964ES5-SD#TRMPBF, Mounted=Yes, PackageDescription="SOT23, 0.95mm pitch; 5 pin, 1.75mm W X 3.00mm L, IPC Medium Density", Part Description="-1.22V to -20V, 200mA, Low Noise, Low Dropout Negative Micropower Regulator", Part Number=LT1964ES5-SD#TRMPBF, Pin Count=5, PressFit=No, Sense=No, SMD=Yes, Socket=No
IC19 IC25 IC36: "3A, 0.8 to 3.6V Adjustable Low-Dropout Linear Regulator with Programmable Soft-Start", Case=QFN20, Manufacturer="TEXAS INSTRUMENTS", Author="CERN DEM JLC", Bonding=No, Component Type=Standard, ComponentHeight=1mm, CreateDate=07.03.2013, Device=TPS74901RGWT, HelpURL=\\cern.ch\dfs\Applications\Altium\Datasheets\TPS74901RGWT.pdf, LatestRevisionDate=07.03.2013, Manufacturer Part Number=TPS74901RGWT, Mounted=Yes, PackageDescription="QFN, 0.65mm pitch,square; 20 pin, 5mm X 5mm X 1mm H body (w/thermal tab 3.25 X 3.25mm),  IPC Medium Density", Part Description="0.8V to 3.6V, 3.0A Low Dropout Linear Regulator with Programmable Soft-Start", Part Number=TPS74901RGWT, Pin Count=21, PressFit=No, Sense=No, SMD=Yes, Socket=No
IC21: "5V Ultralow-Noise, High-PSRR, Fast, RF, 1.5A Low-Dropout Linear Regulator", Case=SOT223, Manufacturer="TEXAS INSTRUMENTS", Author=GK, Bonding=No, ComponentHeight=1.8mm, Component Type=Standard, CreateDate=07.10.2008, Device=TPS79650DCQ, HelpURL=\\cern.ch\dfs\Applications\Altium\Datasheets\TPS78633DCQ.pdf, LatestRevisionDate=13.02.2017, Manufacturer Part Number=TPS79650DCQ, Mounted=Yes, PackageDescription="SOT223, 6-Leads, Body 6.6x7.3mm (max), Pitch 1.27mm, IPC Medium Density", Part Description="5V Ultralow-Noise, High-PSRR, Fast, RF, 1.5A Low-Dropout Linear Regulator", Part Number=TPS79650DCQ, Pin Count=6, PressFit=No, Sense=No, SMD=Yes, Socket=No
IC22: "0.8V to 85% PVIN (4.75-19V), 6A Synchronous Step-Down Regulator Module", Manufacturer="MICROCHIP TECHNOLOGY", Author="CERN DEM JMW", Bonding=No, Component Type=Standard, ComponentHeight=3mm, CreateDate=15.08.2016, Device=MIC45116-1YMP, HelpURL=\\cern.ch\dfs\Applications\Altium\Datasheets\MIC45116-1YMP.pdf, LatestRevisionDate=15.08.2016, Manufacturer Part Number=MIC45116-1YMP, Mounted=Yes, PackageDescription="MICROCHIP_H3QFN88-52LD-PL-3, 0.50mm Pitch, Square, 52 Pin, 8mm L X 8mm W X 3mm H Body", Part Description="0.8V to 85% PVIN (4.75-19V), 6A Synchronous Step-Down Regulator Module", Part Number=MIC45116-1YMP, Pin Count=53, PressFit=No, Sense=No, SMD=Yes, Socket=No
IC23: library part "DCDC_TRACO_TRN 1-1222", "9-18VDC to ±12V, Iout (max) ±45mA, 1W DC-DC Converter", Manufacturer="TRACO POWER", Author=GK, Bonding=No, Component Type=Standard, ComponentHeight=11.5mm, CreateDate=06.06.2017, Device="TRN 1-1222", HelpURL="\\cern.ch\dfs\Applications\Altium\Datasheets\TRN 1-2422.pdf", LatestRevisionDate=06.06.2017, Manufacturer Part Number="TRN 1-1222", Mounted=Yes, PackageDescription="TRN 1 Series , Body 11.9 x 7.7mm", Part Description="9-18VDC to ±12V, Iout (max) ±45mA, 1W DC-DC Converter", Part Number="TRN 1-1222", Pin Count=5, PressFit=No, Sense=No, SMD=No, Socket=No
IC24: "High-Speed Differential Line Receiver", Case=SOT23-5, Manufacturer="TEXAS INSTRUMENTS", Author="CERN DEM JLC", Bonding=No, Component Type=Standard, ComponentHeight=1.45mm, CreateDate=03.03.2011, Device=SN65LVDS2DBVR, HelpURL=\\cern.ch\dfs\Applications\Altium\Datasheets\SN65LVDS2DBVR.pdf, LatestRevisionDate=22.09.2011, Manufacturer Part Number=SN65LVDS2DBVR, Mounted=Yes, PackageDescription="SOT, 0.95mm pitch; 5 pin, 1.60mm W X 2.90mm L X 1.45mm H body, IPC Medium Density", Part Description="High-Speed Differential Line Receiver", Part Number=SN65LVDS2DBVR, Pin Count=5, PressFit=No, Sense=No, SMD=Yes, Socket=No
IC26 IC33: "Digital Temperature Sensor and Thermal Watchdog with Two-Wire Interface", Case=SSOP8, Manufacturer="TEXAS INSTRUMENTS", Author="CERN DEM JLC", Bonding=No, Component Type=Standard, ComponentHeight=1.09mm, CreateDate=15.10.2012, Device=LM75AIMM/NOPB, HelpURL=\\cern.ch\dfs\Applications\Altium\Datasheets\LM75AIMM-NOPB.pdf, LatestRevisionDate=15.10.2012, Manufacturer Part Number=LM75AIMM/NOPB, Mounted=Yes, PackageDescription="SOP, 0.65mm pitch; 8 pin,3.00mm W X 3.00mm L X 1.09mm H bodyI, PC Medium Density", Part Description="-25° to +100°C ±2°C Digital Temperature Sensor and Thermal Watchdog with Two-Wire Interface", Part Number=LM75AIMM/NOPB, Pin Count=8, PressFit=No, Sense=No, SMD=Yes, Socket=No
IC27: "128Mbit, MirrorBit® Flash Non-Volatile Memory CMOS 3.0 Volt Core with Versatile I/O Serial Peripheral Interface with Multi-I/O", Case=SOIC16, Manufacturer=SPANSION, Author="CERN DEM JLC", Bonding=No, Component Type=Standard, ComponentHeight=2.65mm, CreateDate=2014-07-10, Device=S25FL128SAGMFIR01, HelpURL=\\cern.ch\dfs\Applications\Altium\Datasheets\S25FL128SAGMFIR01.pdf, LatestRevisionDate=2014-07-10, Manufacturer Part Number=S25FL128SAGMFIR01, Mounted=Yes, PackageDescription="SOIC 16, Pitch 1.27mm - Body 7.5x10.3mm, IPC Medium Density", Part Description="128Mbit, 133MHz, MirrorBit® Flash Non-Volatile Memory CMOS 3V Core with Versatile I/O Serial Peripheral Interface with Multi-I/O", Part Number=S25FL128SAGMFIR01, Pin Count=11, PressFit=No, Sense=No, SMD=Yes, Socket=No
IC28: "350 mA, Ultra-Low VIN, RF Low-Dropout Linear Regulator With Bias Pin", Case=SON6, Manufacturer="TEXAS INSTRUMENTS", Author="CERN DEM JMW", Bonding=No, Component Type=Standard, ComponentHeight=0.8mm, CreateDate=2019-12-02, Device=TPS72012DRV, HelpURL=\\cern.ch\dfs\Applications\Altium\Datasheets\TPS72012DRV.pdf, LatestRevisionDate=2019-12-02, Manufacturer Part Number=TPS72012DRV, Mounted=Yes, PackageDescription="SON, 0.65mm, Pitch; 6 Pin,2.00mm W X 2.00mm L X 0.80mm H body (W/Thermal Tab 1.1mm X 1.7mm),  IPC Medium Density", Part Description="1.2V, 350mA, Ultra-Low Vin, RF Low-Dropout Linear Regulator With Bias Pin", Part Number=TPS72012DRV, Pin Count=7, PressFit=No, Sense=No, SMD=Yes, Socket=No
IC29: "Ultralow-Noise, High-PSRR, Fast, RF, 1A Low-Dropout Linear Regulator", Case=SOT223, Manufacturer="TEXAS INSTRUMENTS", Author="CERN DEM JLC", Bonding=No, ComponentHeight=1.8mm, Component Type=Standard, CreateDate=14.08.2013, Device=TPS79625DCQG4, HelpURL=\\cern.ch\dfs\Applications\Altium\Datasheets\TPS79625DCQG4.pdf, LatestRevisionDate=14.08.2013, Manufacturer Part Number=TPS79625DCQG4, Mounted=Yes, PackageDescription="SOT223, 6-Leads, Body 6.6x7.3mm (max), Pitch 1.27mm, IPC Medium Density", Part Description="2.5V Ultralow-Noise, High-PSRR, Fast, RF, 1A Low-Dropout Linear Regulator", Part Number=TPS79625DCQG4, Pin Count=6, PressFit=No, Sense=No, SMD=Yes, Socket=No
IC34: "DC to 10GHz, 100mW, 50 Ohm, 10dB, Precision Chip Attenuator", Manufacturer=SUSUMU, Author="CERN DEM MR", Bonding=No, Component Type=Standard, ComponentHeight=0.5mm, CreateDate=04.10.2017, Device=PAT1220-C-10DB-T10, HelpURL=\\cern.ch\dfs\Applications\Altium\Datasheets\PAT1220-C-10DB-T10.pdf, LatestRevisionDate=04.10.2017, Manufacturer Part Number=PAT1220-C-10DB-T10, Mounted=Yes, PackageDescription="SUSUMU PAT1220, 4 Pin Attenuator, Size 0805, L 2.00 x W 1.25 H 0.5mm", Part Description="DC to 10GHz, 100mW, 50 Ohm, 10dB, Precision Chip Attenuator", Part Number=PAT1220-C-10DB-T10, Pin Count=4, PressFit=No, Sense=No, SMD=Yes, Socket=No
IC35: library part REG_ADP151AUJZ-1.8-R7, "1.8V Ultralow Noise, 200 mA CMOS Linear Regulator", Case=SOT23, Manufacturer="ANALOG DEVICES", Author=GK, Bonding=No, Component Type=Standard, ComponentHeight=0.9mm, CreateDate=21.11.2011, Device=ADP151AUJZ-1.8-R7, HelpURL=\\cern.ch\dfs\Applications\Altium\Datasheets\ADP151AUJZ-1.2-R7.pdf, LatestRevisionDate=19.06.2014, Manufacturer Part Number=ADP151AUJZ-1.8-R7, Mounted=Yes, PackageDescription="SOT23, 0.95mm pitch; 5 pin, 1.75mm W X 3.00mm L, IPC Medium Density", Part Description="1.8V, 200mA, Ultralow Noise, CMOS Linear Regulator", Part Number=ADP151AUJZ-1.8-R7, Pin Count=5, PressFit=No, Sense=No, SMD=Yes, Socket=No
IC37 IC38: "1.7V-5.5V, 2K I2C™ Serial EEPROMs with EUI-48™ Node Identity", Case=SOIC8, Manufacturer="MICROCHIP TECHNOLOGY", Author="CERN DEM MR", Bonding=No, Component Type=Standard, ComponentHeight=1.75mm, CreateDate=19.07.2016, Device=24AA025E48-I/SN, HelpURL=\\cern.ch\dfs\Applications\Altium\Datasheets\24AA025E48-I-SN.pdf, LatestRevisionDate=19.07.2016, Manufacturer Part Number=24AA025E48-I/SN, Mounted=Yes, PackageDescription="SOIC 8, Pitch 1.27mm - Body 4x5mm, IPC Medium Density", Part Description="1.7V-5.5V, 2K I2C™ Serial EEPROMs with EUI-48™ Node Identity", Part Number=24AA025E48-I/SN, Pin Count=8, PressFit=No, Sense=No, SMD=Yes, Socket=No
J1 J12: library part 3M_N2530-6002RB, "Connector 30 Male", Manufacturer=3M, Manufacturer Part Number=N2530-6002RB, Author="CERN DEM JLC", Component Type=Standard, ComponentHeight=10.03mm, CreateDate=11.02.2009, Family="Header 30", HelpURL=\\cern.ch\dfs\Applications\Altium\Datasheets\3M_N2530-6002RB.pdf, LatestRevisionDate=11.08.2009, Mounted=Yes, Part Description="30 Contacts - Straight .100'' x .100'' Low Profile Four-Wall Header, 2500 Series", Part Number=3M_N2530-6002RB, Pin Count=30, PressFit=No, Sense=No, SMD=No, Socket=No, Status=None
J2 J3 J4 J5 J6: library part CON_SMA_AMP_132203-14, "50 Ohm Through Hole SMA Right Angle PCB Jack", Manufacturer=AMPHENOL, Manufacturer Part Number=132203-14, Part Number=AMPHENOL_132203-14, Author=GK, Component Type=Standard, ComponentHeight=10.4mm, CreateDate=13.05.2019, Family=SMA, HelpURL=\\cern.ch\dfs\Applications\Altium\Datasheets\AMPHENOL_132203-16.pdf, LatestRevisionDate=13.05.2019, Mounted=Yes, Part Description="50 Ohm Through Hole SMA Right Angle PCB Jack", Pin Count=5, PressFit=No, Sense=No, SMD=No, Socket=No, Status=None
J7: library part SAMTEC_MMCX-J-P-H-ST-TH1, Manufacturer=SAMTEC, Manufacturer Part Number=MMCX-J-P-H-ST-TH1, Author="CERN DEM JLC", Component Type=Standard, ComponentHeight=4.35mm, CreateDate=05.12.2012, HelpURL=\\cern.ch\dfs\Applications\Altium\Datasheets\SAMTEC_MMCX-J-P-H-ST-TH1.pdf, LatestRevisionDate=05.12.2012, Mounted=Yes, Part Description="Straight Through-hole 50 Ohm Micro Mini RF Jack, MMCX Series", Part Number=SAMTEC_MMCX-J-P-H-ST-TH1, Pin Count=2, PressFit=No, Sense=No, SMD=No, Socket=No, Status=None
J8: library part MOLEX_87832-1420, "Connector 14 Male", Manufacturer=MOLEX, Manufacturer Part Number=87832-1420, Author="CERN DEM JLC", Component Type=Standard, ComponentHeight=7.6mm, CreateDate=09.09.2008, Family=Milli-Grid™, HelpURL=\\cern.ch\dfs\Applications\Altium\Datasheets\MOLEX_87832-1420.pdf, LatestRevisionDate=09.09.2008, Mounted=Yes, Part Description="2.00mm (.079\") Pitch Milli-Grid™ Header, Surface Mount, Vertical, Shrouded, 14 Circuits,with Locking Windows and Centre Polarization Slot, PCB Locator", Part Number=MOLEX_87832-1420, Pin Count=14, PressFit=No, Sense=No, SMD=Yes, Socket=No, Status=None
J9: library part SAMTEC_LSS-110-01-L-DV-A, "Connector 20 Hermaphroditic", Manufacturer=SAMTEC, Manufacturer Part Number=LSS-110-01-L-DV-A, Author="CERN DEM MR", Component Type=Standard, ComponentHeight=4.57mm, CreateDate=07.03.2016, HelpURL=\\cern.ch\dfs\Applications\Altium\Datasheets\SAMTEC_LSS-110-01-L-DV-A.pdf, LatestRevisionDate=07.03.2016, Mounted=Yes, Part Description="20 Contacts, Pitch 0.635mm, Razor Beam LSS Vertical High Speed Hermaphroditic Strip (Lead Style 4.5mm)", Part Number=SAMTEC_LSS-110-01-L-DV-A, Pin Count=20, PressFit=No, Sense=No, SMD=Yes, Socket=No, Status=None
J10 J11: library part MOLEX_67800-5005, "7 Pin SATA Receptacle", Manufacturer=MOLEX, Manufacturer Part Number=67800-5005, Author="CERN DEM MR", ClassName=SATA, Component Type=Standard, ComponentHeight=8.4mm, CreateDate=01.12.2016, Family=SATA, HelpURL=\\cern.ch\dfs\Applications\Altium\Datasheets\MOLEX_67800-5005.pdf, LatestRevisionDate=01.12.2016, Mounted=Yes, Part Description="1.27mm Pitch, 7 Contacts, Serial ATA High Speed Header, Straight with Locking Latch", Part Number=MOLEX_67800-5005, Pin Count=7, PressFit=No, Sense=No, SMD=Yes, Socket=No, Status=None
J13 J14A J14B J15 J16 J17: library part HIROSE_U.FL-R-SMT-1(10), Manufacturer="HIROSE (HRS)", Manufacturer Part Number=U.FL-R-SMT-1(10), Author="CERN DEM JLC", Component Type=Standard, ComponentHeight=1.25mm, CreateDate=24.03.2010, Family=U.FL, HelpURL=\\cern.ch\dfs\Applications\Altium\Datasheets\HIROSE_U.FL-R-SMT-1(10).pdf, LatestRevisionDate=24.03.2010, Mounted=Yes, Part Description="Up to 6GHz Ultra Small Surface Mount Male Coaxial Connectors U.FL Series", Part Number=HIROSE_U.FL-R-SMT-1(10), Pin Count=2, PressFit=No, Sense=No, SMD=Yes, Socket=No, Status=None
J18: library part MOLEX_22-27-2031, "Connector 3 Male", Manufacturer=MOLEX, Manufacturer Part Number=22-27-2031, Author="CERN DEM JLC", Component Type=Standard, ComponentHeight=11.7mm, CreateDate=04.12.2008, Family=KK®, HelpURL=\\cern.ch\dfs\Applications\Altium\Datasheets\MOLEX_22-27-2031.pdf, LatestRevisionDate=04.12.2008, Mounted=Yes, Part Description="2.54mm (.100\") Pitch KK® Wire-to-Board Header, Vertical, with Friction Lock, 3 Circuits, Tin (Sn) Plating", Part Number=MOLEX_22-27-2031, Pin Count=3, PressFit=No, Sense=No, SMD=No, Socket=No, Status=None
L1 L6 L12 L21 L23 L28 L30 L32 L36 L37 L39 L40 L53 L54 L55 L56: library part IND0603_56NH_2%_MURATA_LQW18AS56NG0ZD, "Inductor With Core", Case=0603, Manufacturer=MURATA, Manufacturer Part Number=LQW18AS56NG0Z, Power=600mA, Resistance=0R31, Tolerance=±2%, Author="CERN DEM BC", Component Type=Standard, ComponentHeight=1mm, CreateDate=23.04.2020, HelpURL=\\cern.ch\dfs\Applications\Altium\Datasheets\IND_MURATA_LQW18AS56NG0Z.pdf, LatestRevisionDate=23.04.2020, Mounted=Yes, Part Description="Wire Wound RF Inductor For Automotive", Part Number=IND0603_56NH_2%_MURATA_LQW18AS56NG0ZD, Pin Count=2, Sense=No, SMD=Yes, Socket=No
L2A L2B: library part IND_6.5MH_50%_WURTH_WE-SL2-744229, "Inductor Common Mode", Manufacturer="WURTH ELEKTRONIK", Manufacturer Part Number=744229, Power=400mA, Resistance=0.95R, Tolerance=±50%, Author="CERN DEM JLC", Component Type=Standard, ComponentHeight=5.3mm, CreateDate=01.10.2012, HelpURL=\\cern.ch\dfs\Applications\Altium\Datasheets\IND_WURTH_WE-SL2_744229.pdf, LatestRevisionDate=15.10.2012, Mounted=Yes, Part Description="Common Mode SMD Line Filter (WE-SL2 Serie)", Part Number=IND_6.5MH_50%_WURTH_WE-SL2-744229, Pin Count=4, Sense=No, SMD=Yes, Socket=No, Status=None
L3 L9 L44 L45: library part IND_10UH_10%_MURATA-PS_8400, "Inductor With Core", Manufacturer="MURATA POWER SOLUTIONS", Manufacturer Part Number=84103C, Power=950mA, Resistance=0.24R, Tolerance=±10%, Author="CERN DEM JLC", Component Type=Standard, ComponentHeight=2.9mm, CreateDate=02.07.2012, HelpURL=\\cern.ch\dfs\Applications\Altium\Datasheets\IND_MURATA-PS_8400.pdf, LatestRevisionDate=02.07.2012, Mounted=Yes, Part Description="Miniature Surface Mount Power Inductor (8400 Serie)", Part Number=IND_10UH_10%_MURATA-PS_8400, Pin Count=2, Sense=No, SMD=Yes, Socket=No, Status=None
L4 L5 L13 L15 L18 L26: library part IND0603_MURATA_BLM18SG121TN1D, "Inductor", Case=0603, Manufacturer=MURATA, Manufacturer Part Number=BLM18SG121TN1D, Power=3A, Resistance=0.025R, Tolerance=±25%, Author="CERN DEM JLC", Component Type=Standard, ComponentHeight=0.65mm, CreateDate=23.07.2014, HelpURL=\\cern.ch\dfs\Applications\Altium\Datasheets\IND0603_MURATA_BLM18S.pdf, LatestRevisionDate=23.07.2014, Mounted=Yes, Part Description="SMD EMIFIL Suppression Chip Ferrite Bead", Part Number=IND0603_MURATA_BLM18SG121TN1D, Pin Count=2, Sense=No, SMD=Yes, Socket=No, Status=None
  L4 L5: ClassName=Artix
L7 L11 L14 L16A L16B L17 L41: library part IND0603_MURATA_BLM18SG221TN1, Case=0603, Manufacturer=MURATA, Manufacturer Part Number=BLM18SG221TN1, Power=2.5A, Resistance=0.04R, Tolerance=±25%, Author="CERN DEM MR", Component Type=Standard, ComponentHeight=0.95mm, CreateDate=08.01.2016, HelpURL=\\cern.ch\dfs\Applications\Altium\Datasheets\IND0603_MURATA_BLM18S.pdf, LatestRevisionDate=25.10.2018, Mounted=Yes, Part Description="SMD EMIFIL Suppression Chip Ferrite Bead", Part Number=IND0603_MURATA_BLM18SG221TN1, Pin Count=2, Sense=No, SMD=Yes, Socket=No, Status=None
L8: library part IND0603_TDK_MPZ1608R391A, "Inductor", Case=0603, Manufacturer=TDK, Manufacturer Part Number=MPZ1608R391A, Power=1.2A, Resistance=0.12R, Tolerance=±25%, Author="CERN DEM JLC", Component Type=Standard, ComponentHeight=0.95mm, CreateDate=2009-12-02, HelpURL=\\cern.ch\dfs\Applications\Altium\Datasheets\IND0603_TDK_MPZ1608.pdf, LatestRevisionDate=2009-12-02, Mounted=Yes, Part Description="SMT Chip Bead for Power Line", Part Number=IND0603_TDK_MPZ1608R391A, Pin Count=2, Sense=No, SMD=Yes, Socket=No, Status=None
L10: library part IND0603_MURATA_BLM18PG121SN1D, "Inductor", Case=0603, Manufacturer=MURATA, Manufacturer Part Number=BLM18PG121SN1D, Power=2A, Resistance=0.05R, Author="CERN DEM BC", Component Type=Standard, ComponentHeight=0.95mm, CreateDate=2015-07-27, HelpURL=\\cern.ch\dfs\Applications\Altium\Datasheets\IND0603_MURATA_BLM18P.pdf, LatestRevisionDate=2015-07-27, Mounted=Yes, Part Description="SMD EMIFIL Chip Ferrite Bead", Part Number=IND0603_MURATA_BLM18PG121SN1D, Pin Count=2, Sense=No, SMD=Yes, Socket=No, Status=None
L19A L19B L20A L20B L22A L22B L24A L24B L25A L25B L27A L27B L34A L34B L35A L35B L52A L52B: library part IND0402_MURATA_BLM15HD102SN1, Case=0402, Manufacturer=MURATA, Manufacturer Part Number=BLM15HD102SN1D, Power=250mA, Resistance=1.25R, Tolerance=±25%, Author="CERN DEM JLC", Component Type=Standard, ComponentHeight=0.55mm, CreateDate=06.03.2012, HelpURL=\\cern.ch\dfs\Applications\Altium\Datasheets\IND0402_MURATA_BLM15H.pdf, LatestRevisionDate=25.10.2018, Mounted=Yes, Part Description="SMD EMIFIL Suppression Chip Ferrite Bead", Part Number=IND0402_MURATA_BLM15HD102SN1, Pin Count=2, Sense=No, SMD=Yes, Socket=No, Status=None
L29A L29B L31A L31B L33A L33B L38A L38B: library part IND0402_10NH_2%_COILCRAFT_0402DC, "Inductor With Core", Case=0402, Manufacturer=COILCRAFT, Manufacturer Part Number=0402DC-10NXGRW, Power=1A, Resistance=0.073R, Tolerance=±2%, Author=GK, Component Type=Standard, ComponentHeight=0.61mm, CreateDate=04.12.2018, HelpURL=\\cern.ch\dfs\Applications\Altium\Datasheets\IND0402_COILCRAFT_0402DC.pdf, LatestRevisionDate=04.12.2018, Mounted=Yes, Part Description="Ceramic Wirewound Chip Inductor, 0402DC Series", Part Number=IND0402_10NH_2%_COILCRAFT_0402DC, Pin Count=2, Sense=No, SMD=Yes, Socket=No, Status=None
L42 L43 L46 L47 L48 L49 L50 L51: library part IND_2.2UH_20%_BOURNS_SRP5015TA, "Inductor", Manufacturer=BOURNS, Manufacturer Part Number=SRP5015TA-2R2M, Power=4A, Resistance=0.045R, Tolerance=±20%, Author="CERN DEM JMW", Component Type=Standard, ComponentHeight=1.5mm, CreateDate=24.06.2019, HelpURL=\\cern.ch\dfs\Applications\Altium\Datasheets\IND_BOURNS_SRP5015TA.pdf, LatestRevisionDate=24.06.2019, Mounted=Yes, Part Description="Shielded SMD Power Inductor", Part Number=IND_2.2UH_20%_BOURNS_SRP5015TA, Pin Count=2, Sense=No, SMD=Yes, Socket=No, Status=None
LD1 LD4 LD9 LD10 LD11 LD12 LD13 LD14 LD15 LD16 LD17 LD18 LD19 LD20 LD21: library part LED_0603_Green, "Green 0603", Manufacturer=KINGBRIGHT, Manufacturer Part Number=KPH-1608CGCK, Part Number=LED_KINGBRIGHT_KPH-1608CGCK, Author="CERN DEM JLC", Bonding=No, Color=Green, Component Type=Standard, ComponentHeight=0.65mm, CreateDate=03.07.2017, HelpURL=\\cern.ch\dfs\Applications\Altium\Datasheets\LED_KINGBRIGHT_KPH-1608CGCK.pdf, LatestRevisionDate=03.07.2017, Mounted=Yes, PackageDescription="SMT Green LED, Case 0603, Body L 1.6 x W 0.8mm H 0.65mm", Part Description="SMD Green LED, Case 1.6mmX0.8mm(0603), 0.65mm Thickness", Pin Count=2, PressFit=No, Sense=No, SMD=Yes, Socket=No
LD2 LD5 LD6 LD7 LD8: library part LED_DIALIGHT_571-0112F, "2x LED  Botom Green, Top Red", Manufacturer=DIALIGHT, Manufacturer Part Number=571-0112F, Author="CERN DEM JLC", Bonding=No, Color=Red/Green, Component Type=Standard, ComponentHeight=8.6mm, CreateDate=09.11.2009, HelpURL=\\cern.ch\dfs\Applications\Altium\Datasheets\LED_DIALIGHT_571-0112F.pdf, LatestRevisionDate=17.03.2010, Mounted=Yes, PackageDescription="2x 2mm LED (Top: Red, Bot: Green) PCB Edge Mounting (Without positioning pins) DIALIGHT 571 Serie", Part Description="Dual 2mm  LEDs, Red Top,Green Bot, CBI® Circuit Board Indicator (Without positioning pins)", Part Number=LED_DIALIGHT_571-0112F, Pin Count=4, PressFit=No, Sense=No, SMD=No, Socket=No
LD3: library part LED_KINGBRIGHT_KPH-1608CGCK, "LED Green 1C 2A", Manufacturer=KINGBRIGHT, Manufacturer Part Number=KPH-1608CGCK, Author="CERN DEM JLC", Bonding=No, Color=Green, Component Type=Standard, ComponentHeight=0.65mm, CreateDate=03.07.2017, HelpURL=\\cern.ch\dfs\Applications\Altium\Datasheets\LED_KINGBRIGHT_KPH-1608CGCK.pdf, LatestRevisionDate=03.07.2017, Mounted=Yes, PackageDescription="SMT Green LED, Case 0603, Body L 1.6 x W 0.8mm H 0.65mm", Part Description="SMD Green LED, Case 1.6mmX0.8mm(0603), 0.65mm Thickness", Part Number=LED_KINGBRIGHT_KPH-1608CGCK, Pin Count=2, PressFit=No, Sense=No, SMD=Yes, Socket=No